# Altium PCB AVP32F069_EVM_Rev1.1_220623.PcbDoc (part 1 of 2)
Units mm, origin at the board's own origin, x right, y up, seen from the top; angles counter-clockwise.
Board outline 130.01 x 88 mm, 4 copper layers (Top Layer, GND, S1, Bottom Layer), stack 2.642 mm thick; 134 components, 131 nets, 561 pads, 238 vias.
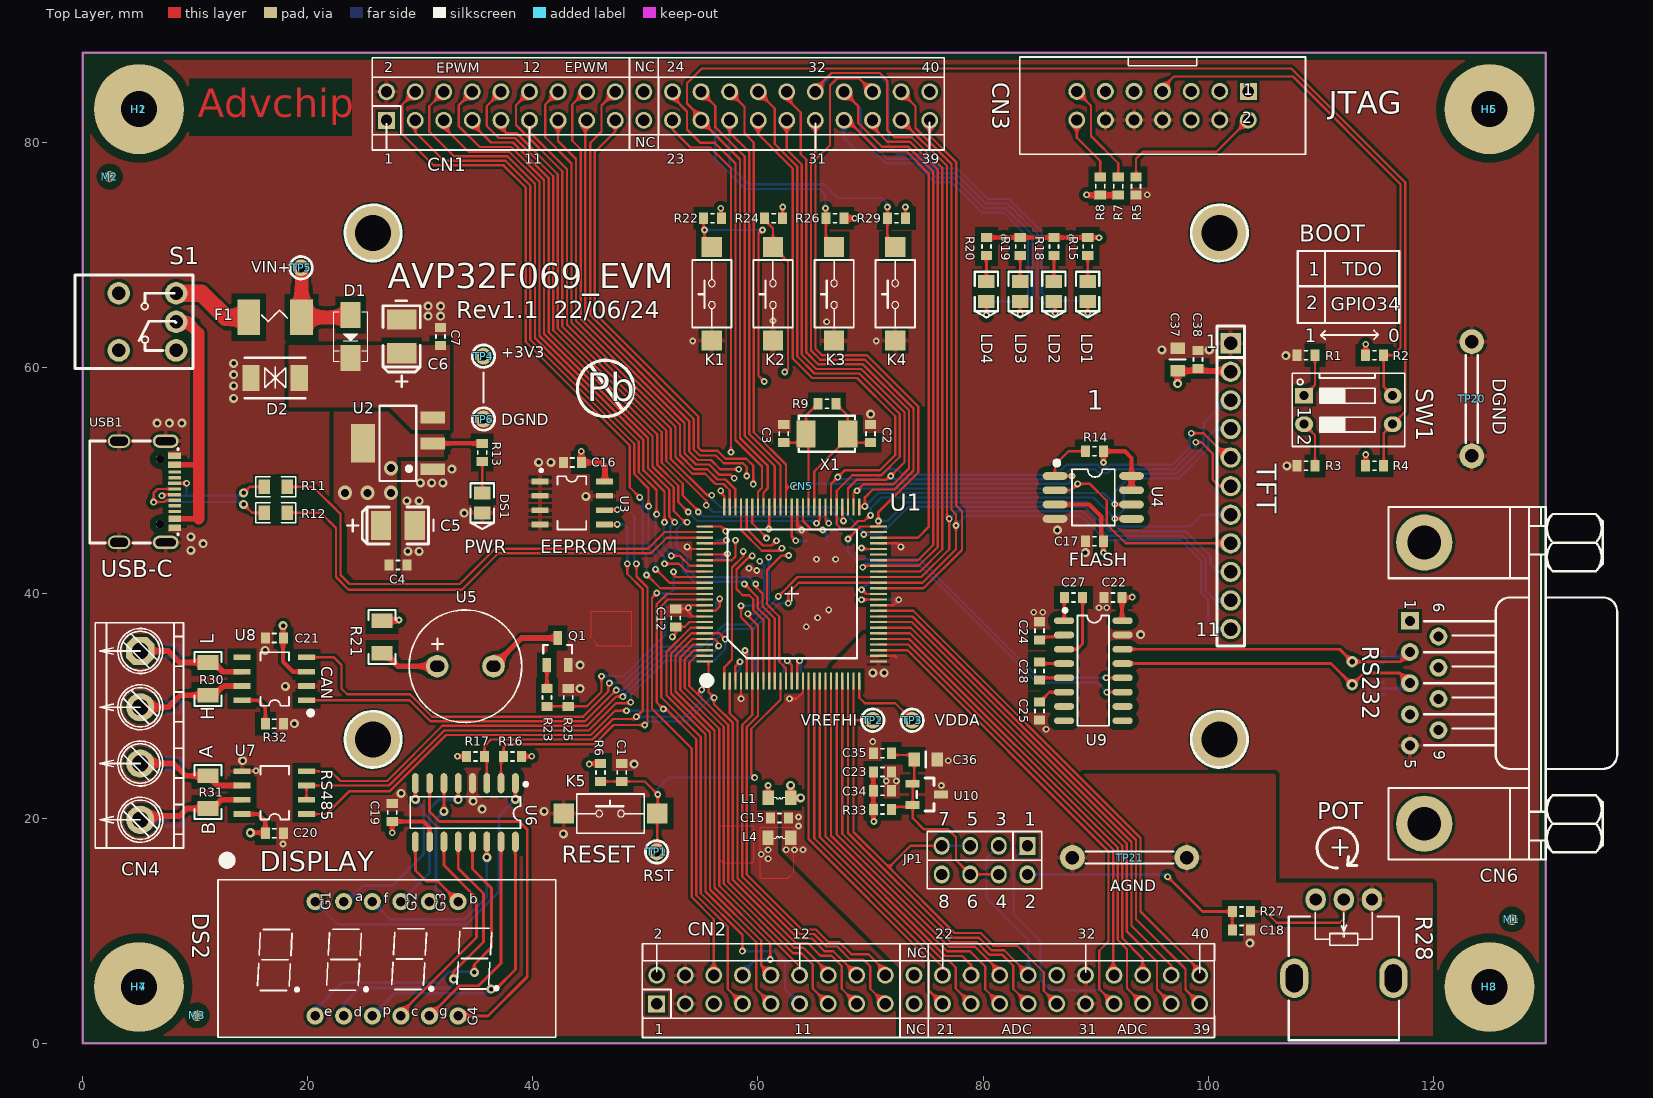
[diagram p0: Top Layer view]
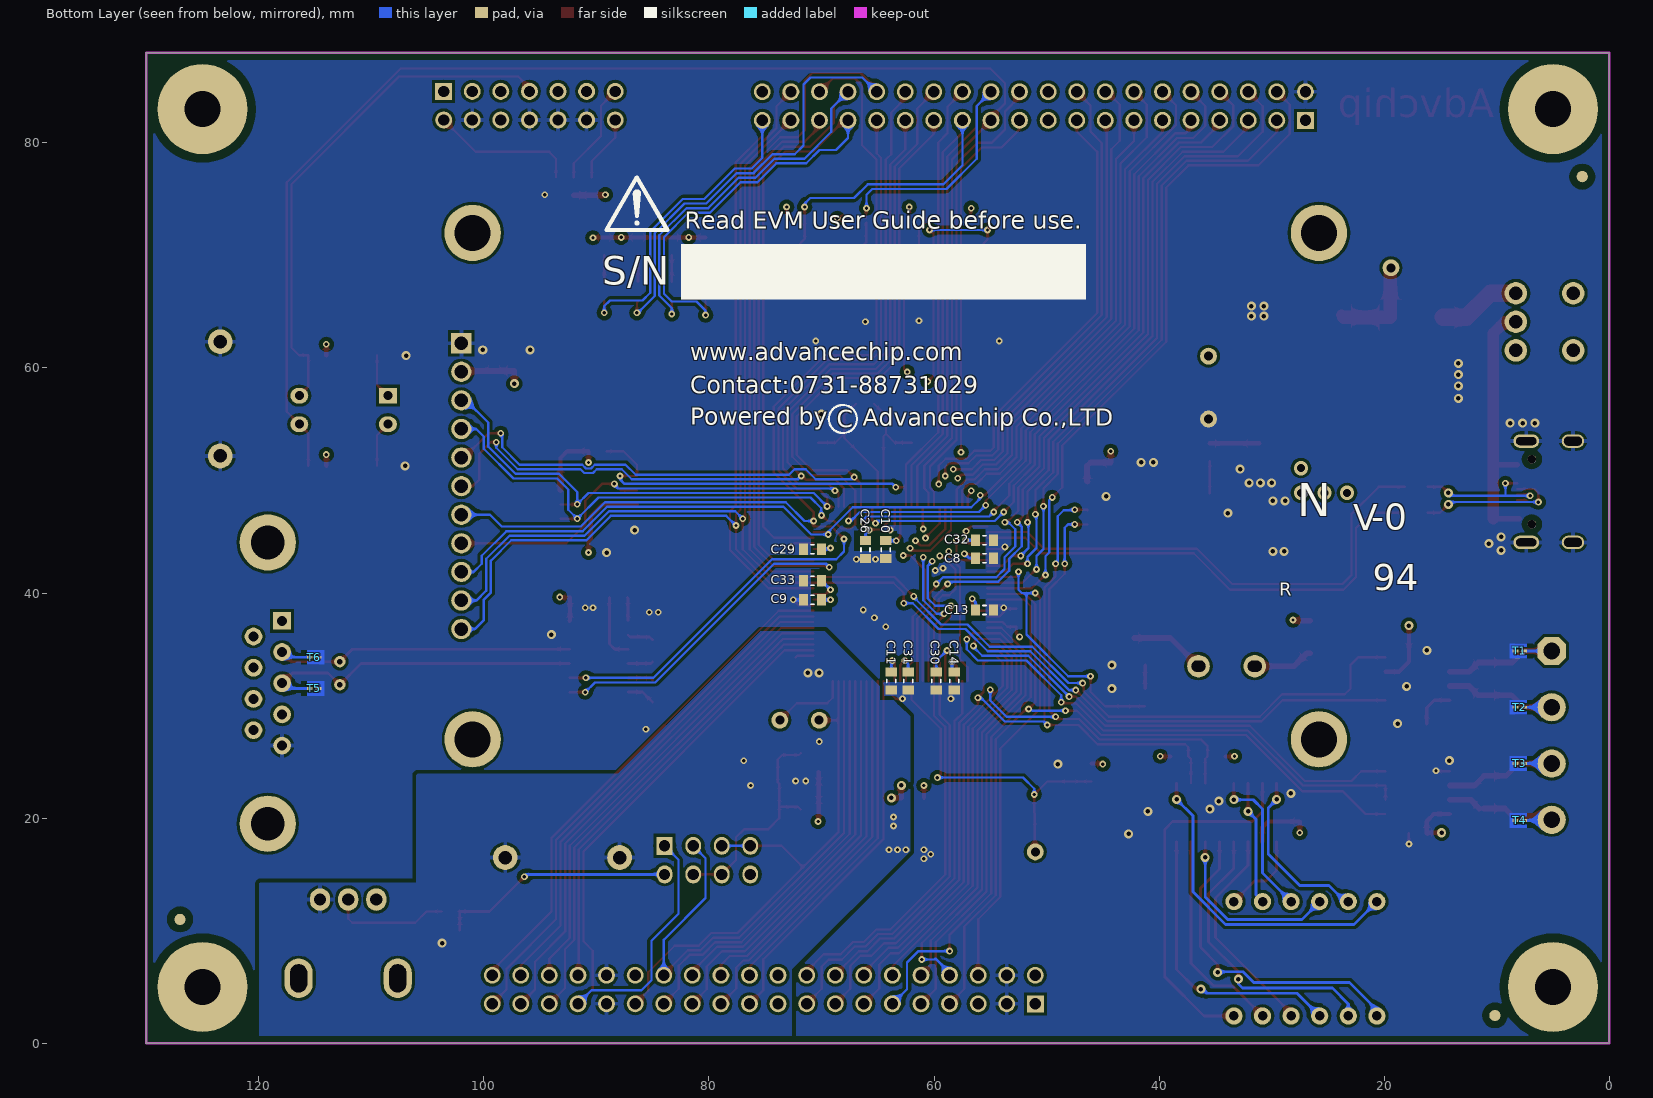
[diagram p1: Bottom Layer view, seen from below]
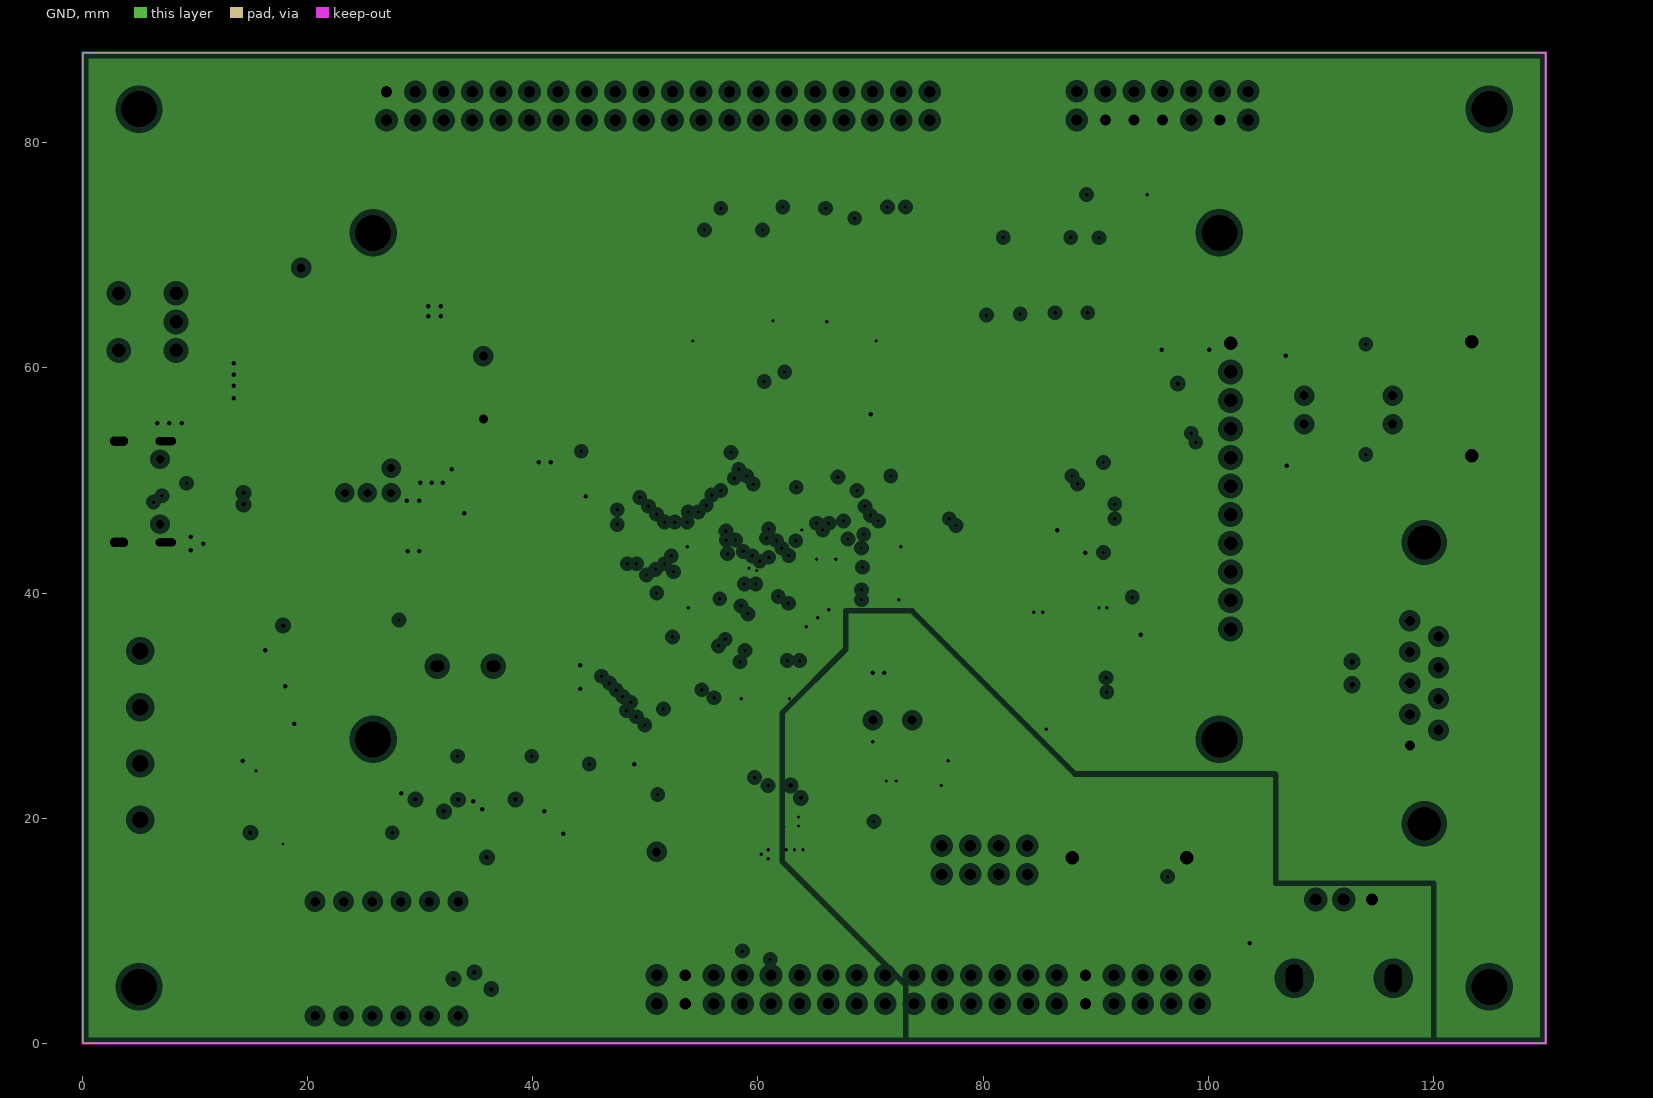
[diagram p2: GND, clearances drawn from the general rule]
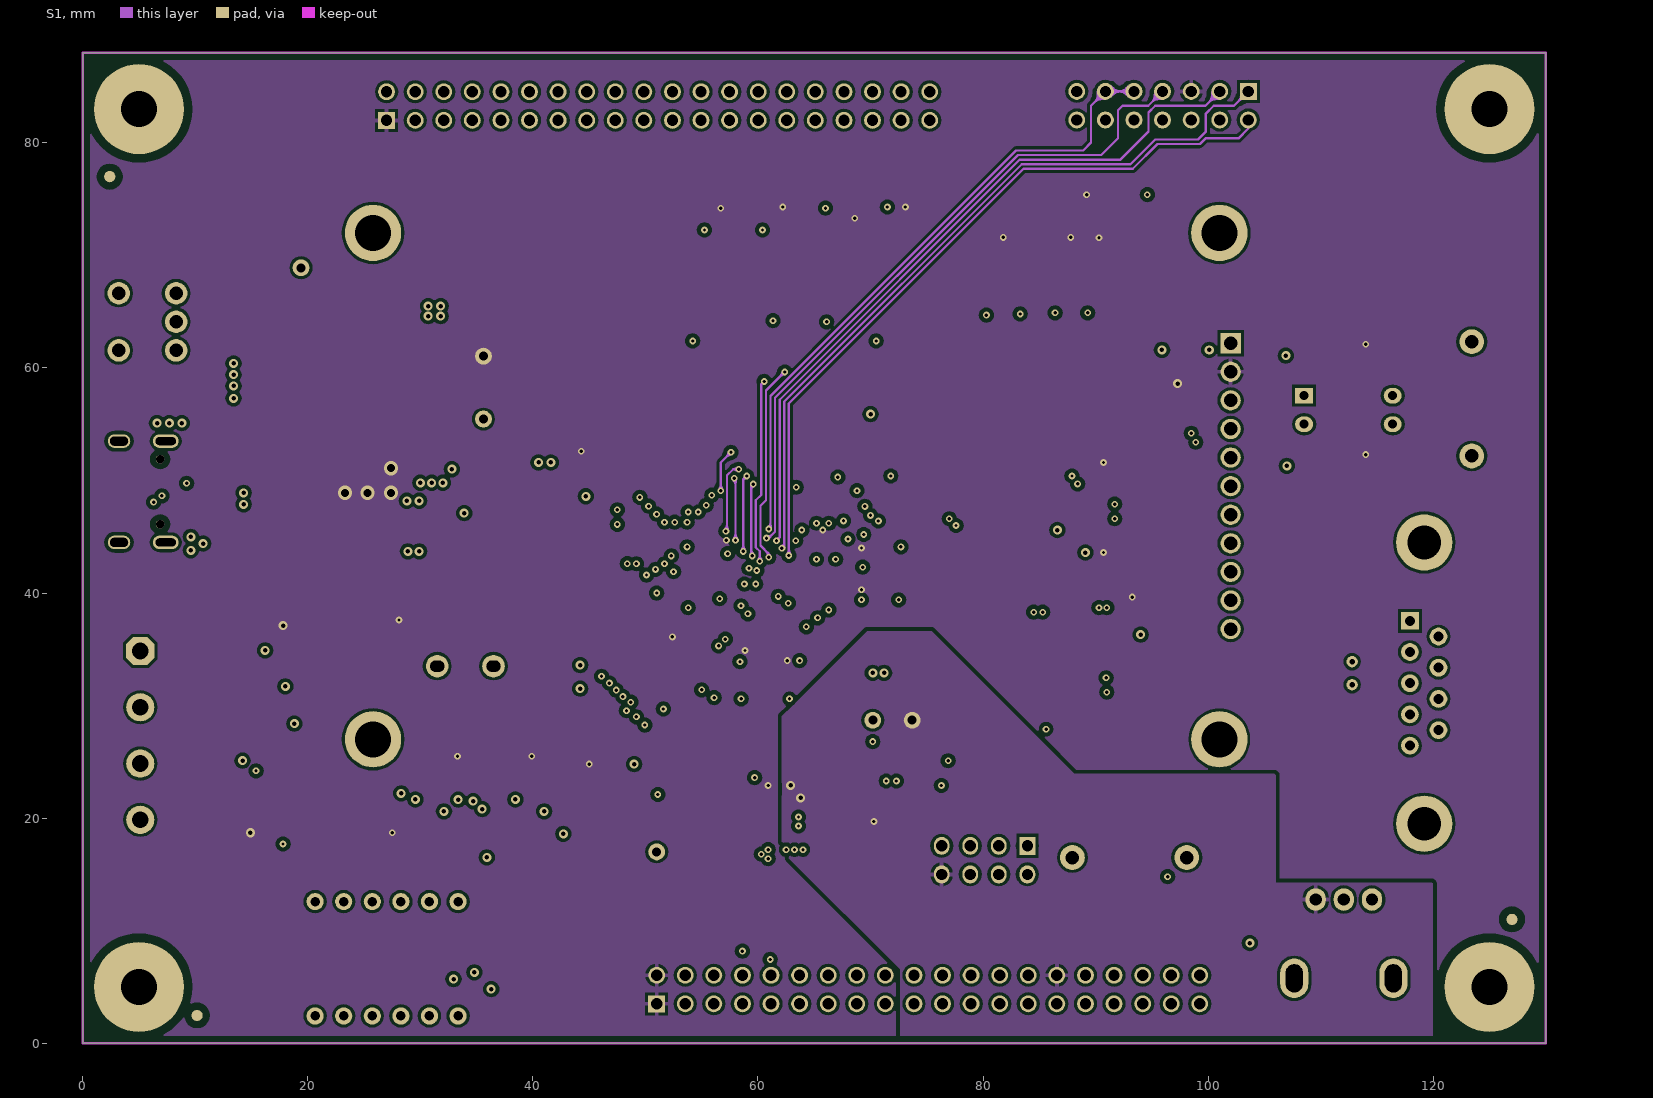
[diagram p3: S1]

## Layer stack, top to bottom
Top Solder: solder mask 0.0102, Solder Resist, Dk 3.5
Top Layer: signal copper 0.0711
Dielectric 3: dielectric 0.254, Dk 4.2
GND: plane copper 0.036, net (Multiple Nets)
Dielectric4: dielectric 0.32, FR-4, Dk 4.8
S1: signal copper 0.036
Dielectric 4: dielectric 0.254, Dk 4.2
Dielectric 2: core 1.6, FR-4, Dk 4.2
Bottom Layer: signal copper 0.0711
Bottom Solder: solder mask 0.0102, Solder Resist, Dk 3.5

## Board outline
0,0 0,88 130.013,88 130.013,0

## Design rules (kind name [scope] priority, off if disabled: settings)
AcuteAngle [All] p1 off: minimum=4.50000000000000E+0001 checktracksonly=FALSE
AssemblyTestPointUsage [All] p1: valid=2
BoardOutlineClearance BoardOutlineClearance_MountingHoles [OnCopper and InComponentClass('Mounting Holes')] p1: gap=1.016 ignorepadtopadclearanceinfootprint=FALSE
BoardOutlineClearance BoardOutlineClearance_Poly [OnCopper and IsPoly] p2: gap=0.635 ignorepadtopadclearanceinfootprint=FALSE
Clearance Clearance_PAD_NC [InNet('PAD_NC')] p1: gap=0.381 ignorepadtopadclearanceinfootprint=TRUE
Clearance Clearance_dingwei [HasFootprint('NY PMS 440 0025 PH')] p2: gap=0.762 ignorepadtopadclearanceinfootprint=TRUE
Clearance Clearance_MCU [All vs InComponent('U1')] p3: gap=0.152 ignorepadtopadclearanceinfootprint=TRUE except(0.381: SMDPad-Fill SMDPad-Poly SMDPad-Region) // MCU安全间距
Clearance Clearance_Keepouts [((IsTrack Or IsArc) And Not InPoly) And IsFree and IsKeepOut vs ((IsTrack Or IsArc) And Not InPoly) And IsFree and IsKeepOut] p4: gap=0 ignorepadtopadclearanceinfootprint=FALSE
Clearance Clearance_Poly [InPolygon] p5: gap=0.254 ignorepadtopadclearanceinfootprint=TRUE except(0.381: Fill-Fill Fill-Poly Fill-Region Poly-Poly Poly-Region Region-Region; 0.508: SMDPad-SMDPad SMDPad-THPad SMDPad-Fill SMDPad-Poly SMDPad-Region SMDPad-Text SMDPad-Hole THPad-THPad THPad-Via THPad-Text THPad-Hole Via-Text Via-Hole Fill-Text Fill-Hole Poly-Text Poly-Hole Region-Text Region-Hole Text-Text Text-Hole)
Clearance [All] p6: gap=0.203 ignorepadtopadclearanceinfootprint=TRUE except(0.127: Arc-Via Track-Via)
ComponentClearance [All] p1 off: gap=0.762 collisioncheckmode=3 verticalgap=0.254 showdistances=FALSE
DiffPairsRouting [All] p1: maxlimit=2.54 minlimit=0.254 mostfreqgap=0.254 toplayer_minwidth=0.381 toplayer_maxwidth=0.381 toplayer_prefwidth=0.381 midlayer1_minwidth=0.381 midlayer1_maxwidth=0.381 midlayer1_prefwidth=0.381 bottomlayer_minwidth=0.381 bottomlayer_maxwidth=0.381 bottomlayer_prefwidth=0.381 maxuncoupledlength=25.4
FabricationTestPointUsage TestPointUsage [All] p1: valid=2 allowmultiple=FALSE
FabricationTestpoint Testpoint [All] p1: side=3 testpointundercomponent=TRUE minsize=1.016 maxsize=2.54 preferedsize=1.524 minholesize=0 maxholesize=1.016 preferedholesize=0.813 testpointgrid=0.025 allowsidetop=TRUE allowsidebottom=TRUE usegrid=TRUE gridtolerance=0
FanoutControl Fanout_LCC [IsLCC] p1: bgadir=Out bgaviamode=Centered fanoutstyle=Auto fanoutdirection=Alternating viagrid=0.025 // Fanout_LCC (Default Rule)
FanoutControl Fanout_SOIC [IsSOIC] p2: bgadir=Out bgaviamode=Centered fanoutstyle=Auto fanoutdirection=Alternating viagrid=0.025 // Fanout_SOIC (Default Rule)
FanoutControl Fanout_Default [All] p3: bgadir=Out bgaviamode=Centered fanoutstyle=Auto fanoutdirection=Alternating viagrid=0.025 // Fanout_Default (Default Rule)
HoleSize [All] p1: absolutevalues=TRUE maxlimit=6.375 minlimit=0.203 maxpercent=80.000 minpercent=20.000
Length SRAM_DATA [InNetClass('SRAM_DATA')] p1 off: maxlimit=43.688 minlimit=41.148
Length SRAM_ADDR [InNetClass('SRAM_ADDR')] p2 off: maxlimit=46.177 minlimit=43.637 // 高速线长度
MinimumAnnularRing MinimumAnnularRing_ThermalPadVias [IsVia and InAnyComponent] p1: minimumring=0.15
MinimumAnnularRing [All] p2: minimumring=0.127
MinimumSolderMaskSliver [All] p1: minsoldermaskwidth=0
PlaneClearance [All] p1: clearance=0.508
PlaneConnect [All] p1: planeconnectstyle=Direct reliefexpansion=0.254 reliefentries=4 reliefconductorwidth=0.254 reliefairgap=0.254
PolygonConnect PolygonConnect_Connectors [All vs (HasFootprint('IDC2X10') OR HasFootprint('IDC2X16') OR HasFootprint('IDC2X22') OR HasFootprint('IDC14-L') OR HasFootprint('DC-005') OR HasFootprint('J-DG128-2') OR HasFootprint('PJ325')OR HasFootprint('RK09K1130') OR HasFootprint('SIP11_TFT') OR HasFootprint('USB-C-SMD-16P') OR HasFootprint('SIP4X2A'))] p1: thpad.connectstyle=Relief thpad.reliefconductorwidth=0.381 thpad.reliefentries=4 thpad.polygonreliefangle="90 Angle" thpad.airgapwidth=0.254 smdpad.connectstyle=Direct smdpad.reliefconductorwidth=0.254 smdpad.reliefentries=4 smdpad.polygonreliefangle="90 Angle" smdpad.airgapwidth=0.254 via.connectstyle=Direct via.reliefconductorwidth=0.254 via.reliefentries=4 via.polygonreliefangle="90 Angle" via.airgapwidth=0.254
PolygonConnect PolygonConnect_SMD2 [All vs (HasFootprint('C0603') OR HasFootprint('R0603') OR HasFootprint('SOT-23-6') OR HasFootprint('C1206') OR HasFootprint('C0805') OR HasFootprint('R0805') OR HasFootprint('SH1.0-8P') OR HasFootprint('SOT-23') OR HasFootprint('SIP3') OR HasFootprint('0603_LED_RED_NP'))] p2: thpad.connectstyle=Relief thpad.reliefconductorwidth=0.381 thpad.reliefentries=4 thpad.polygonreliefangle="90 Angle" thpad.airgapwidth=0.254 smdpad.connectstyle=Direct smdpad.reliefconductorwidth=0.381 smdpad.reliefentries=4 smdpad.polygonreliefangle="90 Angle" smdpad.airgapwidth=0.254 via.connectstyle=Direct via.reliefconductorwidth=0.254 via.reliefentries=4 via.polygonreliefangle="90 Angle" via.airgapwidth=0.254
PolygonConnect PolygonConnect_SMD1 [All vs ( HasFootprint('DB9') OR HasFootprint('SO-8') OR HasFootprint('SW-3X6') OR HasFootprint('LQFP-100') OR HasFootprint('SMD_LED0805_LED') OR HasFootprint('CASE-A-3216') OR HasFootprint('IDC2X20') OR HasFootprint('J-DG128-5') OR HasFootprint('Harwin_D3082-05'))] p3: thpad.connectstyle=Relief thpad.reliefconductorwidth=0.381 thpad.reliefentries=4 thpad.polygonreliefangle="90 Angle" thpad.airgapwidth=0.254 smdpad.connectstyle=Relief smdpad.reliefconductorwidth=0.381 smdpad.reliefentries=4 smdpad.polygonreliefangle="90 Angle" smdpad.airgapwidth=0.254 via.connectstyle=Direct via.reliefconductorwidth=0.254 via.reliefentries=4 via.polygonreliefangle="90 Angle" via.airgapwidth=0.254
PolygonConnect [All] p4: connectstyle=Direct reliefconductorwidth=0.254 reliefentries=4 polygonreliefangle="90 Angle" airgapwidth=0.254
RoutingVias ThermalPadVias [IsVia and InAnyComponent] p1: holewidth=0.305 width=0.635 viastyle="Through Hole" minholewidth=0.254 minwidth=0.508 maxholewidth=0.762 maxwidth=1.27
RoutingVias [All] p2: holewidth=0.305 width=0.635 viastyle="Through Hole" minholewidth=0.254 minwidth=0.508 maxholewidth=0.762 maxwidth=1.27
SilkToBoardRegionClearance [Not ((IsComment or IsDesignator) And (Hide <> 'False')) and not InRegion(1000,500,4000,800)] p1:
SilkToSilkClearance SilkToSilkClearance_Pb-FreeLogo [(HasFootprint('Pb-Free_Overlay_Medium') OR HasFootprint('Pb-Free_Overlay_Small')) vs (HasFootprint('Pb-Free_Overlay_Medium') OR HasFootprint('Pb-Free_Overlay_Small'))] p1 off: silktosilkclearance=0
SilkToSilkClearance [All] p2 off: silktosilkclearance=0.102
SilkToSolderMaskClearance SilkToComponentPadClearance [(IsPad or IsFill or IsRegion) and InAnycomponent] p1 off: minsilkscreentomaskgap=0.099 clearancetoexposedcopper=TRUE
SilkToSolderMaskClearance "Silk to Solder Mask Opening" [All] p2 off: minsilkscreentomaskgap=0.102 clearancetoexposedcopper=FALSE
SolderMaskExpansion [All] p1: expansion=0.05
Width [All] p1: maxlimit=2.54 minlimit=0.152 preferedwidth=0.254 checkconnectedcopper=TRUE
14 further rules are at their usual default settings.

## Classes and differential pairs
component class 2.Power: C4 C5 C6 C7 C8 C9 C10 C11 C12 C13 C14 C15 C23 C26 C29 C30 C31 C32 C33 D1 D2 DS1 F1 H1 H2 H3 H4 H5 H6 H7 H8 L1 L4 Logo1 M1 M2 M3 R11 R12 R13 S1 TP2 TP3 TP4 TP5 TP6 TP20 TP21 TP30 U2 USB1
component class "3.uC Peripheral": C16 C17 C18 C19 C34 C35 C36 C511 C514 C515 DS2 JP1 K1 K2 K3 K4 LD1 LD2 LD3 LD4 Q1 R14 R15 R16 R17 R18 R19 R20 R21 R22 R23 R24 R25 R26 R27 R28 R29 R33 U3 U4 U5 U6 U10
component class "4.Communication Interface": C20 C21 C22 C24 C25 C27 C28 C58 CN4 CN6 CN7 R30 R31 R32 T1 T2 T3 T4 T5 T6 U7 U8 U9

## Components (designator, comment, footprint, x,y, rotation, side; value= is the part's Value field where it differs from the comment)
C1 "0.1uF/50V" C0603 47.9,24.05 r90 top value=0.1uF
C2 "22pF/50V" C0603 70,54.155 r90 top value=100pF
C3 "22pF/50V" C0603 62.3,54.155 r270 top value=100pF
C4 "0.1uF/50V" C0603 28,42.5 r0 top value=0.1uF
C5 "100uF/10V" CASE-B_3528 28,46 r180 top
C6 "100uF/10V" CASE-B_3528 28.342,62.8 r270 top
C7 "0.1uF/50V" C0603 31.8,62.8 r90 top value=0.1uF
C8 "2.2uF/25V" C0603 55.5,43.1 r0 bottom value=2.2uF
C9 "2.2uF/25V" C0603 70.8,39.4 r180 bottom value=2.2uF
C10 "2.2uF/25V" C0603 64.281,43.849 r90 bottom value=2.2uF
C11 "2.2uF/25V" C0603 63.8,32.2 r90 bottom value=2.2uF
C12 "0.1uF/50V" C0603 52.7,37.8 r90 top value=0.1uF
C13 "2.2uF/25V" C0603 55.5,38.5 r0 bottom value=2.2uF
C14 "2.2uF/25V" C0603 58.2,32.2 r90 bottom value=2.2uF
C15 "1uF/25V" C0603 61.91,20.019 r180 top value=1uF
C16 "0.1uF/50V" C0603 43.5,51.6 r180 top value=0.1uF
C17 "0.1uF/50V" C0603 89.9,44.6 r180 top value=0.1uF
C18 "0.1uF/50V" C0603 102.95,10.049 r0 top value=0.1uF
C19 "0.1uF/50V" C0603 27.5,20.5 r90 top value=0.1uF
C20 "0.1uF/50V" C0603 17.022,18.662 r0 top value=0.1uF
C21 "0.1uF/50V" C0603 17.022,36 r180 top value=0.1uF
C22 "0.1uF/50V" C0603 91.551,39.6 r180 top value=0.1uF
C23 "2.2uF" C0603 71.051,24.1 r180 top
C24 "0.1uF/50V" C0603 85.019,36.649 r90 top value=0.1uF
C25 "0.1uF/50V" C0603 85.019,29.505 r270 top value=0.1uF
C26 "2.2uF" C0603 66.081,43.849 r90 bottom
C27 "0.1uF/50V" C0603 88.051,39.6 r0 top value=0.1uF
C28 "0.1uF/50V" C0603 85.019,33.077 r270 top value=0.1uF
C29 "2.2uF" C0603 70.8,43.9 r180 bottom
C30 "2.2uF" C0603 59.8,32.2 r90 bottom
C31 "2.2uF" C0603 62.3,32.2 r90 bottom
C32 "2.2uF" C0603 55.5,44.7 r0 bottom
C33 "2.2uF" C0603 70.8,41.1 r180 bottom
C34 "1uF/25V" C0603 71.051,22.433 r0 top value=1uF
C35 "0.1uF/50V" C0603 71.051,25.767 r180 top value=0.1uF
C36 "10uF/10V" C0805 74.9,25.2 r0 top value=10uF
C37 "10uF/10V" C0805 97.3,60.749 r90 top
C38 "0.1uF/50V" C0603 99.1,60.749 r90 top value=0.1uF
CN1 "2.54-2X20P 排针" IDC2X20 27,82 r0 top locked
CN2 "2.54-2X20P 排针" IDC2X20 51,3.5 r0 top locked
CN3 "2.54-2X7P 简易牛角母座" IDC14-L 98.488,83.286 r180 top value=2.54-2X7P
CN4 "KF301-4P-5.08" J-DG128-4 5.113,27.35 r270 top
CN5 "2.54MM*11P 单排排母" SIP11_TFT 102,49.5 r0 top locked
CN6 "DB9" db9 119.2,32 r0 top locked
D1 "SS14" SMA 23.8,62.8 r90 top
D2 "SMBJ6.8CA" SMB2 17.1,59.1 r0 top
DS1 "黄色LED" SMD_LED0805_LED 35.5,48 r90 top
DS2 "FJ3461AH" 0.36X4 27,7.5 r0 top value=0.36×4
F1 "1.5A/24V" 1812_PTC_NP 17.1,64.5 r0 top
H1 "M3*12+6" "NY PMS 440 0025 PH" 5,83 r90 top locked
H2 "PN-3" Keystone_1902C 5,83 r0 top locked
H3 "M3*12+6" "NY PMS 440 0025 PH" 125,5 r90 top locked
H4 "PN-3" Keystone_1902C 5,5 r0 top locked
H5 "M3*12+6" "NY PMS 440 0025 PH" 125,83 r90 top locked
H6 "PN-3" Keystone_1902C 125,83 r0 top locked
H7 "M3*12+6" "NY PMS 440 0025 PH" 5,5 r90 top locked
H8 "PN-3" Keystone_1902C 125,5 r0 top locked
JP1 "XH2.54-2X4P" SIP4X2A 80.13,16.27 r270 top
K1 "1TS002B-2400-5001-CT" SW-3X6 55.9,66.6 r90 top value=1TS002B
K2 "1TS002B-2400-5001-CT" SW-3X6 61.333,66.6 r90 top value=1TS002B
K3 "1TS002B-2400-5001-CT" SW-3X6 66.767,66.6 r90 top value=1TS002B
K4 "1TS002B-2400-5001-CT" SW-3X6 72.2,66.6 r90 top value=1TS002B
K5 "1TS002B-2400-5001-CT" SW-3X6 46.9,20.4 r0 top value=1TS002B
L1 "BLM21PG221SN" L-0805 61.916,21.8 r180 top value=220Ω@100MHZ
L4 "BLM21PG221SN" L-0805 61.91,18.266 r0 top value=220Ω@100MHZ
LD1 "Red" SMD_LED0805_LED 89.3,66.8 r90 top
LD2 "Red" SMD_LED0805_LED 86.3,66.8 r90 top
LD3 "Red" SMD_LED0805_LED 83.3,66.8 r90 top
LD4 "Red" SMD_LED0805_LED 80.3,66.8 r90 top
Logo1 "CAUTION.  READ USER GUIDE BEFORE USE" IEC_Caution_Small 407.4,418.8 r180 bottom
M1 "" Mark1 127,11 r0 top
M2 "" Mark1 2.4,77 r0 top
M3 "" Mark1 10.16,2.464 r0 top
Q1 "2N7002K" MOS-SOT23 42.2,34.8 r0 top
R1 "1KΩ" R0603 108.7,61.137 r0 top value=1K
R2 "10KΩ" R0603 114.797,61.137 r180 top value=1K
R3 "1KΩ" R0603 108.7,51.3 r0 top value=1K
R4 "10KΩ" R0603 114.8,51.3 r180 top value=1K
R5 "2.2KΩ" R0603 93.6,76.15 r90 top value=1K
R6 "10KΩ" R0603 46,24.05 r270 top value=1K
R7 "10KΩ" R0603 92.007,76.15 r90 top value=1K
R8 "10KΩ" R0603 90.413,76.15 r90 top value=1K
R9 "1MΩ" R0603 66.125,56.822 r180 top value=1K
R11 "22Ω" 0805RX 17.141,49.433 r0 top value=1K
R12 "22Ω" 0805RX 17.141,47.133 r0 top value=1K
R13 "1KΩ" R0603 35.5,52.5 r270 top value=1K
R14 "10KΩ" R0603 89.9,52.6 r180 top value=1K
R15 "1KΩ" R0603 89.3,70.8 r90 top value=1K
R16 "2.2KΩ" R0603 38.2,25.476 r0 top value=1K
R17 "2.2KΩ" R0603 34.9,25.476 r180 top value=1K
R18 "1KΩ" R0603 86.3,70.8 r90 top value=1K
R19 "1KΩ" R0603 83.3,70.8 r90 top value=1K
R20 "1KΩ" R0603 80.3,70.8 r90 top value=1K
R21 "22R" 1206RX 26.6,36.1 r270 top value=1K
R22 "10KΩ" R0603 55.95,73.3 r180 top value=1K
R23 "1KΩ" R0603 41.25,30.734 r270 top value=1K
R24 "10KΩ" R0603 61.4,73.3 r180 top value=1K
R25 "4.7KΩ" R0603 43.15,30.734 r90 top value=1K
R26 "10KΩ" R0603 66.85,73.3 r180 top value=1K
R27 "1KΩ" R0603 102.95,11.7 r180 top value=1K
R28 "RK09K1130A6S  10KΩ" RK09K1130 112.057,5.766 r180 top locked
R29 "10KΩ" R0603 72.3,73.3 r180 top value=1K
R30 "120R" 1206RX 11.122,32.379 r270 top
R31 "120R" 1206RX 11.122,22.304 r270 top value=1K
R32 "10KΩ" R0603 17.022,28.379 r180 top value=1K
R33 "470R" R0603 71.051,20.767 r0 top
S1 "SMTS-102C3" SW2 8.3,64.1 r0 top
SW1 "DS-02RP" DIP-KEY-2 107.465,59.52 r270 top
T1 "SPARK_GAP" SPARK_GAP 8.085,34.85 r270 bottom
T2 "SPARK_GAP" SPARK_GAP 8.085,29.85 r270 bottom
T3 "SPARK_GAP" SPARK_GAP 8.085,24.862 r270 bottom
T4 "SPARK_GAP" SPARK_GAP 8.085,19.8 r270 bottom
T5 "SPARK_GAP" SPARK_GAP 114.954,31.527 r90 bottom
T6 "SPARK_GAP" SPARK_GAP 114.954,34.3 r90 bottom
TP1 "RST" TEST-0.8/1.5MM 51,17 r0 top
TP2 "VREFHI" TEST-0.8/1.5MM 70.2,28.7 r0 top
TP3 "VDDA" TEST-0.8/1.5MM 73.7,28.7 r0 top
TP4 "+3V3" TEST-0.8/1.5MM 35.608,61.052 r0 top
TP5 "VIN+" TEST-0.8/1.5MM 19.4,68.9 r0 top
TP6 "DGND" TEST-0.8/1.5MM 35.608,55.464 r0 top
TP20 "D3082-05" Harwin_D3082-05 123.425,57.258 r90 top
TP21 "D3082-05" Harwin_D3082-05 93.02,16.5 r180 top
U1 "AVP32F069QP100S" LQFP-100 63,40 r90 top locked
U2 "AMS1117-3.3V" SOT-223 28,53.3 r90 top
U3 "AT24C02D-SSHM-T" SO-8 43.5,48 r270 top
U4 "W25Q32JVSSIQ" SOIC-8_208mil 89.8,48.5 r270 top
U5 "Cy-9650-3029" SUN-0905-3V 34,33.5 r0 top locked
U6 "AIP650" SOIC-16_150mil 34,20.5 r180 top locked
U7 "SP3485EN-L/TR" SO-8 17.022,22.262 r90 top
U8 "SN65HVD230D" SO-8 17.022,32.379 r90 top
U9 "SP3232EEN" SOIC-16_150mil 89.8,33.1 r270 top
U10 "TL431" SOT-23 75,22.1 r180 top
USB1 "TYPE-C-31-M-31" USB-C-SMD-16P 5.7,49 r90 top
X1 "YSX530GA 10MHZ 20pF 10ppm" XTAL_5032 66.125,54.149 r0 top value=10MHZ

## Footprints (in the part's own frame and the unit in brackets; to place one, negate y for a bottom-side part, rotate by r counter-clockwise, add the part's x,y. Pads: shape width x height; smd on the part's side, far side on the other; paste and mask are expansions set on the pad)
0.36X4 [mil] "4位0.36寸数码管"
  round 60 hole 33.46: a(-150,200) b(250,200) c(50,-200) com1(-250,200) com2(50,200) com3(150,200) com4(250,-200) d(-150,-200) dp(-50,-200) e(-250,-200) f(-50,200) g(150,-200)
  silkscreen extent -590,-275 592,276, body extent -591,-276 591,276, height 283
0805RX [mil] "标准型  间距40mil"
  rect 40x50 smd: 1(-40,0) 2(40,0)
  silkscreen extent -70,-35 70,35, body extent -38,-25 41,25, height 22
1206RX [mm]
  rect 1.3x1.85 smd: 1(-1.45,0) 2(1.45,0)
  silkscreen extent -2.4,-1.21 2.4,1.21, body extent -1.57,-0.8 1.63,0.8, height 0.6
1812_PTC_NP [mil]
  rect 80x125 smd: 1(-92.5,0) 2(92.5,0)
  silkscreen extent -47,-15 42,25, body extent -84,-63 94,63, height 20
C0603 [mm] "无丝印       D=1.6"
  rect 0.8x1 smd mask+0.051: 1(-0.8,0) 2(0.8,0)
  silkscreen extent -0.15,-0.4 0.15,0.4, body extent -0.71,-0.38 0.81,0.38, height 0.68
C0805 [mil]
  rect 40x50 smd: 1(-40,0) 2(40,0)
  silkscreen extent 0,-28 0,28, body extent -59,-28 59,27, height 37
CASE-B_3528 [mm]
  rect 1.8x2.6 smd: 1(1.5,0) 2(-1.5,0)
  silkscreen extent -3.17,-1.65 4.5,1.65, body extent -1.85,-1.47 1.85,1.46, height 2.03
db9 [mil]
  round 196.67 hole 118.33: 0(0,-492.08) 0(0,492.08)
  rect 62x62 hole 35: 1(-50,217.92)
  round 62 hole 35: 2(-50,108.75) 3(-50,-0.42) 4(-50,-109.58) 5(-50,-218.75) 6(50,162.92) 7(50,53.75) 8(50,-55.42) 9(50,-164.58)
  silkscreen extent -125,-617 675,616, body extent -108,-601 550,600, height 124
DIP-KEY-2 [mm]
  rect 1.4x1.6 hole 0.8: 1(1.98,1.065)
  oval 1.4x1.6 hole 0.8: 2(4.52,1.065) 3(4.52,8.935) 4(1.98,8.935)
  silkscreen extent 0,0 6.5,10, body extent -0.05,-0.08 6.55,10.08, height 6.9
Harwin_D3082-05 [mm] "Shorting Plug, 10.16mm spacing, TH     D=1.0"
  round 2.2 hole 1.2: 1(-5.08,0) 2(5.08,0)
  silkscreen extent -3.9,-0.53 3.9,0.53, body extent -5.6,-0.52 5.61,0.52, height 6.63
IDC2X20 [mm] "2.54X40P双排插针"
  rect 1.5x1.5 hole 1: 1(0,0)
  round 1.5 hole 1: 2(0,2.54) 3(2.54,0) 4(2.54,2.54) 5(5.08,0) 6(5.08,2.54) 7(7.62,0) 8(7.62,2.54) 9(10.16,0) 10(10.16,2.54) 11(12.7,0) 12(12.7,2.54) 13(15.24,0) 14(15.24,2.54) 15(17.78,0) 16(17.78,2.54) 17(20.32,0) 18(20.32,2.54) 19(22.86,0) 20(22.86,2.54) 21(25.4,0) 22(25.4,2.54) 23(27.94,0) 24(27.94,2.54) 25(30.48,0) 26(30.48,2.54) 27(33.02,0) 28(33.02,2.54) 29(35.56,0) 30(35.56,2.54) 31(38.1,0) 32(38.1,2.54) 33(40.64,0) 34(40.64,2.54) 35(43.18,0) 36(43.18,2.54) 37(45.72,0) 38(45.72,2.54) 39(48.26,0) 40(48.26,2.54)
  silkscreen extent -1.27,-1.27 49.56,3.84, body extent -1.23,-1.23 49.61,3.85, height 8.4
IDC14-L [mm]
  rect 1.5x1.5 hole 1: 1(-5.084,-1.29)
  round 1.5 hole 1: 2(-5.084,1.25) 3(-2.544,-1.29) 4(-2.544,1.25) 5(-0.004,-1.29) 6(-0.004,1.25) 7(2.536,-1.29) 8(2.536,1.25) 9(5.076,-1.29) 10(5.076,1.25) 11(7.616,-1.29) 12(7.616,1.25) 13(10.156,-1.29) 14(10.156,1.25)
  silkscreen extent -10.16,-4.34 15.24,4.3, body extent -10.18,-4.47 15.26,4.65, height 9.1
IEC_Caution_Small [mm]
  silkscreen extent 318.28,-346.56 323.72,-341.85
J-DG128-4 [mm]
  oct 2.5x2.5 hole 1.5: 1(-7.5,0)
  round 2.5 hole 1.5: 2(-2.5,0) 3(2.5,0) 4(7.5,0)
  silkscreen extent -10,-4 10,3.84, body extent -10,-3.59 10,3.91, height 10
Keystone_1902C [mil] "Hex Standoff, 4-40 threaded, nylon"
  round 1 on Mech4: 0(0,0)
  body extent -145,-126 146,126, height 501
L-0805 [mil] "标准型  间距40mil 电感"
  rect 40x50 smd: 1(-40,0) 2(40,0)
  silkscreen extent -20,-3 19,3, body extent -39,-26 39,24, height 36
LQFP-100 [mm]
  rect 1.5x0.2 smd: 1(-7.807,6.006) 2(-7.807,5.506) 3(-7.807,5.006) 4(-7.807,4.506) 5(-7.807,4.006) 6(-7.807,3.506) 7(-7.807,3.006) 8(-7.807,2.506) 9(-7.807,2.006) 10(-7.807,1.506) 11(-7.807,1.006) 12(-7.807,0.506) 13(-7.807,0.006) 14(-7.807,-0.494) 15(-7.807,-0.994) 16(-7.807,-1.494) 17(-7.807,-1.994) 18(-7.807,-2.494) 19(-7.807,-2.994) 20(-7.807,-3.494) 21(-7.807,-3.994) 22(-7.807,-4.494) 23(-7.807,-4.994) 24(-7.807,-5.494) 25(-7.807,-5.994) 51(7.643,-5.994) 52(7.643,-5.494) 53(7.643,-4.994) 54(7.643,-4.494) 55(7.643,-3.994) 56(7.643,-3.494) 57(7.643,-2.994) 58(7.643,-2.494) 59(7.643,-1.994) 60(7.643,-1.494) 61(7.643,-0.994) 62(7.643,-0.494) 63(7.643,0.006) 64(7.643,0.506) 65(7.643,1.006) 66(7.643,1.506) 67(7.643,2.006) 68(7.643,2.506) 69(7.643,3.006) 70(7.643,3.506) 71(7.643,4.006) 72(7.643,4.506) 73(7.643,5.006) 74(7.643,5.506) 75(7.643,6.006)
  rect 0.2x1.5 smd: 26(-6.082,-7.719) 27(-5.582,-7.719) 28(-5.082,-7.719) 29(-4.582,-7.719) 30(-4.082,-7.719) 31(-3.582,-7.719) 32(-3.082,-7.719) 33(-2.582,-7.719) 34(-2.082,-7.719) 35(-1.582,-7.719) 36(-1.082,-7.719) 37(-0.582,-7.719) 38(-0.082,-7.719) 39(0.418,-7.719) 40(0.918,-7.719) 41(1.418,-7.719) 42(1.918,-7.719) 43(2.418,-7.719) 44(2.918,-7.719) 45(3.418,-7.719) 46(3.918,-7.719) 47(4.418,-7.719) 48(4.918,-7.719) 49(5.418,-7.719) 50(5.918,-7.719) 76(5.918,7.731) 77(5.418,7.731) 78(4.918,7.731) 79(4.418,7.731) 80(3.918,7.731) 81(3.418,7.731) 82(2.918,7.731) 83(2.418,7.731) 84(1.918,7.731) 85(1.418,7.731) 86(0.918,7.731) 87(0.418,7.731) 88(-0.082,7.731) 89(-0.582,7.731) 90(-1.082,7.731) 91(-1.582,7.731) 92(-2.082,7.731) 93(-2.582,7.731) 94(-3.082,7.731) 95(-3.582,7.731) 96(-4.082,7.731) 97(-4.582,7.731) 98(-5.082,7.731) 99(-5.582,7.731) 100(-6.082,7.731)
  silkscreen extent -8.09,-5.8 5.65,7.87, body extent -8.18,-8.1 8.02,8.1, height 2
Mark1 [mm] "基准点 无边框"
  round 1 all layers, no hole: 0(0,0)
MOS-SOT23 [mm] "焊盘加长型"
  rect 0.762x1.27 smd: D(0,1.2) G(-0.95,-1.2) S(0.95,-1.2)
  silkscreen extent -1.27,-0.15 1.27,0.58, body extent -1.45,-1.5 1.45,1.3, height 1.2
"NY PMS 440 0025 PH" [mm] "4-40 nylon screw and mounting hole"
  round 8 hole 3.2: 1(0,0)
  body extent -3.3,-3.3 3.3,3.3, height 2.69
R0603 [mm] "无丝印 脚距1.6mm  0.8/1mm 焊盘"
  rect 0.8x1 smd mask+0.051: 1(-0.8,0) 2(0.8,0)
  silkscreen extent -0.15,-0.4 0.15,0.4, body extent -0.79,-0.4 0.81,0.4, height 0.43
RK09K1130 [mm] "立式可调电位器"
  oval 2.5x3.5 hole 1.5 slot 2.5 at 90 deg: 0(-4.4,0) 0(4.4,0)
  oval 1.8x2 hole 1.1: 1(-2.5,-7) 2(0,-7) 3(2.5,-7)
  silkscreen extent -4.9,-5.88 4.9,5.5, body extent -5.7,-7.15 5.7,5.5, height 19.5
SIP4X2A [mm]
  rect 1.6x1.4 hole 1: 1(-1.27,3.81)
  oval 1.6x1.4 hole 1: 2(1.27,3.81) 3(-1.27,1.27) 4(1.27,1.27) 5(-1.27,-1.27) 6(1.27,-1.27) 7(-1.27,-3.81) 8(1.27,-3.81)
  silkscreen extent -2.54,-5.08 2.54,5.08, body extent -2.59,-5.13 2.44,5.03, height 8.89
SIP11_TFT [mm]
  round 5 hole 3.2: 0(-76.2,-22.5) 0(-76.2,22.5) 0(-1,-22.5) 0(-1,22.5)
  rect 1.8x1.8 hole 1.2: 1(0,12.7)
  round 1.8 hole 1.2: 2(0,10.16) 3(0,7.62) 4(0,5.08) 5(0,2.54) 6(0,0) 7(0,-2.54) 8(0,-5.08) 9(0,-7.62) 10(0,-10.16) 11(0,-12.7)
  silkscreen extent -1.22,-14.22 1.22,14.22, body extent -1.27,-14 1.27,13.94, height 8.5
SMA [mm] "DO-214AC"
  rect 2.3x1.75 smd: 1(1.9,0) 2(-1.9,0)
  silkscreen extent -2.2,-1.5 2.2,1.5, body extent -2.3,-1.37 2.3,1.33, height 2.4
SMB2 [mm] "双向TVS"
  rect 1.52x2.3 smd: 1(-2.14,0) 2(2.14,0)
  silkscreen extent -2.7,-1.8 2.7,1.8, body extent -2.7,-1.8 2.7,1.8, height 2.3
SMD_LED0805_LED [mm]
  rect 1.16x1.47 smd: 1(0.875,0) 2(-0.875,0)
  silkscreen extent -2.3,-1.04 1.76,1.03, body extent -1.01,-0.62 1.01,0.62, height 1.1
SO-8 [mil]
  rect 20x60 smd: 1(-75,-112.5) 2(-25,-112.5) 3(25,-112.5) 4(75,-112.5) 5(75,112.5) 6(25,112.5) 7(-25,112.5) 8(-75,112.5)
  silkscreen extent -119,-114 93,49, body extent -96,-111 96,125, height 64
SOIC-8_208mil [mm]
  oval 0.7x2.2 smd: 1(-1.905,-3.4) 2(-0.635,-3.4) 3(0.635,-3.4) 4(1.905,-3.4) 5(1.905,3.4) 6(0.635,3.4) 7(-0.635,3.4) 8(-1.905,3.4)
  silkscreen extent -3.25,-3.45 2.5,1.9, body extent -2.73,-4 2.73,4.1, height 1.75
SOIC-16_150mil [mm]
  oval 0.6x1.8 smd: 1(-4.445,-2.6) 2(-3.175,-2.6) 3(-1.905,-2.6) 4(-0.635,-2.6) 5(0.635,-2.6) 6(1.905,-2.6) 7(3.175,-2.6) 8(4.445,-2.6) 9(4.445,2.6) 10(3.175,2.6) 11(1.905,2.6) 12(0.635,2.6) 13(-0.635,2.6) 14(-1.905,2.6) 15(-3.175,2.6) 16(-4.445,2.6)
  silkscreen extent -5.51,-2.66 4.9,1.4, body extent -5,-2.8 4.98,3.11, height 1.45
SOT-23 [mm]
  rect 1.25x0.7 smd: 1(1.25,-0.95) 2(1.25,0.95) 3(-1.25,0)
  silkscreen extent -0.65,-1.46 0.9,1.46, body extent -1.5,-1.5 1.5,1.5, height 1.3
SOT-223 [mm] "SOT-223/SC-73; 4 Leads; Body 6.7 x 7.3 mm, inc. leads (LxW max)"
  rect 1.05x2.15 smd: 1(-2.3,-3.1) 2(0,-3.1) 3(2.3,-3.1)
  rect 3.4x2.15 smd: 2(0,3.1)
  silkscreen extent -3.35,-1.63 3.35,1.63, body extent -3.3,-3.5 3.4,3.71, height 1.85
SPARK_GAP [mil] "无Paste层"
  rect 10x20 smd paste-39.37: 1(0,20) 2(0,-10)
  Top Layer region: -15,30 -25,30 -25,-30 25,-30 25,30 15,30 15,-20 -15,-20
SUN-0905-3V [mm] "蜂鸣器/9.6*5 有源 3V 电磁蜂鸣器"
  round 2 hole 1 slot 1.25 at 0 deg: 1(-2.5,0) 2(2.5,0)
  silkscreen extent -5,-5 5,5, body extent -4.99,-5 5,5, height 6.05
SW2 [mm] "扭子开关单刀无复位无中点"
  round 2 hole 1.2: 0(-5.1,-2.54) 0(-5.1,2.54) 1(0,-2.54) 2(0,0) 3(0,2.54)
  silkscreen extent -9,-4.15 1.5,4.15, body extent -26.1,-4.11 0.7,4.01, height 5.96
SW-3X6 [mm] "立创商城 轻触开关 3X6 鸿源精密"
  rect 1.8x1.8 smd mask+0.05: 1(4.15,0) 2(-4.15,0)
  silkscreen extent -3,-1.75 3,1.75, body extent -2.95,-1.75 2.95,1.75, height 4
TEST-0.8/1.5MM [mm]
  round 1.5 hole 0.8: 1(0,0)
  silkscreen extent -1,-1 1,1
USB-C-SMD-16P [mm]
  oval 1.2x2.3 hole 0.7 slot 1.8 at 90 deg: 0(-4.5,-1.675) 0(4.5,-1.675)
  oval 1.2x2 hole 0.8 slot 1.6 at 90 deg: 0(-4.5,2.475) 0(4.5,2.475)
  rect 0.3x1.15 smd mask+0.08: A1B12(3.05,-2.473) A1B12(3.35,-2.473) A4B9(2.25,-2.471) A4B9(2.55,-2.471) A5(1.25,-2.475) A6(0.25,-2.475) A7(-0.25,-2.473) A9B4(-2.55,-2.475) A9B4(-2.25,-2.475) A12B1(-3.35,-2.475) A12B1(-3.05,-2.475) B5(-1.75,-2.475) B6(-0.75,-2.475) B7(0.75,-2.473)
  rect 0.3x1.148 smd mask+0.08: A8(1.75,-2.475) B8(-1.25,-2.475)
  round 0.75 hole 0.75 unplated: ""(-2.89,-1.175) ""(2.89,-1.175)
  silkscreen extent -4.56,-2.75 4.5,5.08, body extent -4.45,-2.87 4.49,5.03, height 3.25
XTAL_5032 [mm] "5032晶振"
  rect 1.7x2.4 smd: 1(-1.85,0) 2(1.85,0)
  silkscreen extent -2.5,-1.6 2.5,1.6, body extent -2.53,-1.55 2.47,1.65, height 1.3

## Part data
C1 C4 C7 C8 C9 C10 C11 C12 C13 C14 C15 C16 C17 C18 C19 C20 C21 C22 C23 C24 C25 C26 C27 C28 C29 C30 C31 C32 C33 C34 C35 C36 C37 C38: library part Cap, "贴片电容", LatestRevisionDate=17-Jul-2002, LatestRevisionNote="Re-released for DXP Platform.", Published=8-Jun-2000, Publisher="Altium Limited"
C2 C3: library part Cap, "COG贴片电容", LatestRevisionDate=17-Jul-2002, LatestRevisionNote="Re-released for DXP Platform.", Published=8-Jun-2000, Publisher="Altium Limited"
C5 C6: library part CAP2, "钽电容", Tolerance error=10%, Brand Name=三星, cost=￥0.01
CN1 CN2: library part "CON 20X2A", "连接器"
CN3: library part Receptacle_7X2, "连接器"
CN4: library part CON4, "连接器"
CN5: library part KH-2.54FH-1X11P-H8.5, "连接器", BOM_Manufacturer=kinghelm(金航标), BOM_Manufacturer Part=KH-2.54FH-1X11P-H8.5, BOM_Supplier=LCSC, BOM_Supplier Part=C2932674, Contributor=LCSC, spicePre=U, spiceSymbolName=KH-2.54FH-1X11P-H8.5
CN6: library part "D Connector 9", "DB9插座", PackageDocument=O, DatasheetDocument=1-Sep-1999, Gender=Receptacle, LatestRevisionDate=17-Jul-2002, LatestRevisionNote="Re-released for DXP Platform.", Orientation="Right Angle", PackageReference=788750, Positions=9, Published=15-Jun-2001, Publisher="Altium Limited"
D1: library part "D Schottky", "肖特基二极管", Code_JEDEC=DO-214-AA, LatestRevisionDate=17-Jul-2002, LatestRevisionNote="Re-released for DXP Platform.", Published=8-Jun-2000, Publisher="Altium Limited"
D2: library part TVS, "TVS二极管", LatestRevisionDate=17-Jul-2002, LatestRevisionNote="Re-released for DXP Platform.", Published=8-Jun-2000, Publisher="Altium Limited"
DS1 LD1 LD2 LD3 LD4: library part LED0, "发光二极管", LatestRevisionDate=08-Jul-2005, LatestRevisionNote="Mech Layer 1 removed.", PackageDescription="LED; 2 Leads", PackageReference=LED-0, Published=8-Jun-2000, Publisher="Altium Limited"
DS2: library part "Dpy Amber-4K", "4位0.36英寸红色共阴七段数码管", Pin=12, 焊接类型=直插
F1: library part "Fuse Thermal", "自恢复保险丝", LatestRevisionDate=17-Jul-2002, LatestRevisionNote="Re-released for DXP Platform.", PackageReference=PIN-W2/E2.8, Published=24-Mar-1999, Publisher="Altium Limited"
H1 H3 H5 H7: library part CMP-0003617-1, "安装孔"
H2 H4 H6 H8: library part CMP-0003610-1, "Standoff, Hex, 0.5\"L #4-40 Nylon"
JP1: library part Jumper2, "2.54双排插针", LatestRevisionDate=17-Jul-2002, LatestRevisionNote="Re-released for DXP Platform.", Published=24-Mar-1999, Publisher="Altium Limited"
K1 K2 K3 K4 K5: library part SW-PB, "鸿源精密轻触开关3X6", LatestRevisionDate=17-Jul-2002, LatestRevisionNote="Re-released for DXP Platform.", Published=24-Mar-1999, Publisher="Altium Limited"
L1 L4: library part FB1, "贴片电感", Code_IEC=1005, Code_JEITA=0402, LatestRevisionDate=29-May-2009, LatestRevisionNote="IPC-7351 Footprint Added.", PackageDescription="Chip Inductor", PackageReference=0402-A, Published=8-Jun-2000, Publisher="Altium Limited"
Logo1: library part CMP-0074836-1, "IEC 61010-1 Caution Warning"
M1 M2 M3: library part CMP-0077181-1, "MARK点"
Q1: library part 2SK3019, "N-MOSFET 60V300mA低开启电压", LatestRevisionDate=17-Jul-2002, LatestRevisionNote="Re-released for DXP Platform.", Published=8-Jun-2000, Publisher="Altium Limited"
R1 R2 R3 R4 R5 R6 R7 R8 R9 R11 R12 R13 R14 R15 R16 R17 R18 R19 R20 R21 R22 R23 R24 R25 R26 R27 R29 R30 R31 R32: library part Res, "贴片电阻", LatestRevisionDate=17-Jul-2002, LatestRevisionNote="Re-released for DXP Platform.", Published=8-Jun-2000, Publisher="Altium Limited"
R28: library part "RPot SM", "立式可调电位器", DatasheetDocument=Oct-2003, Published=17-Dec-2003, Publisher="Altium Limited"
R33: library part Res, "贴片电阻", Operating Temperature Range=-55~+125℃, Power Rating=1/10W, Temperature Coefficient="100ppm/ ℃", Tolerance=1%, Voltage Rating=75V, Category=贴片电阻, Composition="Thick Film", MountType="Surface Mount (SMD - SMT)", PackageReference=0603, RoHS=Y, Storage Room  Code=000000, Supplier 2=1
S1: library part SW-SPDT, "红色卧式弯脚小型扭子开关5脚2档", DatasheetDocument=05-Dec-2000, LatestRevisionDate=17-Dec-2003, LatestRevisionNote="Schematic revised, PCB Footprint replaced.", Published=24-Mar-1999, Publisher="Altium Limited"
SW1: library part SW-2B, "红色2PIN-2.54mm立式直插正拨拨码开关", LatestRevisionDate=17-Jul-2002, LatestRevisionNote="Re-released for DXP Platform.", Published=24-Mar-1999, Publisher="Altium Limited"
T1 T2 T3 T4 T5 T6: library part "GND SIDE", "静电GAP"
TP1 TP2 TP3 TP4 TP5 TP6: library part TP, "测试点"
TP20 TP21: library part CMP-0075110-1, "锰铜采样电阻 脚距10mm", Manufacturer=Harwin, Supplier Part Number 1=952-1873-ND, CNHeader=False, ComponentLink1Description="Datasheet URL", ComponentLink1URL=http://cdn.harwin.com/pdfs/D3080-D3083.pdf, CompType="Jumper Wire", CT=False, Green_EU RoHS="Passed with Exemption", Green_EU RoHS-2=Passed, Green_Lifecycle=Active, Green_REACh=Passed, LatestRevisionDate=2017-07-12, MountType=TH, PackageReference="Shorting Plug, 10.16mm spacing, TH", PartNumber=D3082-05, Publisher="Texas Instruments", RoHS=Y, Supplier 1=Digi-Key, Supplier 2=Newark, Supplier 3=Mouser, Supplier Part Number 2=01E9240, Supplier Part Number 3=855-D3082-05
U1: "进芯32位浮点DSP"
U2: library part ASM1117-3.3V, "线性稳压器"
U3: library part AT24C02C, "EEPROM存储器"
U4: library part W25Q128, "华邦FLASH存储器"
U5: library part BEEP, "超音V有源蜂鸣器 电磁式 脚距5,外径9.5mm"
U6: library part AIP650E, "无锡中微LED驱动芯片"
U7: library part SP3485E, "3.3V 485总线收发器"
U8: "3.3V CANͨѶ"
U9: library part MAX232, "低压232通讯芯片"
U10: library part AZ431AN-ATRE1, "2.5V基准芯片 0.5%, 1R,2C,3A", spiceSymbolName=https://item.szlcsc.com/192500.html
USB1: "Type-C 母座 卧贴", BOM_JLCPCB Part Class="Extended Part", BOM_Manufacturer=韩国韩荣, BOM_Manufacturer Part=TYPE-C-31-M-31, BOM_Supplier=LCSC, BOM_Supplier Part=C2760486, Contributor=LCSC, JLCPCB Part Class="Extended Part", spicePre=U, spiceSymbolName=TYPE-C-31-M-31
X1: library part XTAL, "5032贴片无源晶振", LatestRevisionDate=17-Jul-2002, LatestRevisionNote="Re-released for DXP Platform.", Published=8-Jun-2000, Publisher="Altium Limited"

## Free pads (board coordinates)
  round 1 hole 0.5: 4(112.8,31.853) 4(112.8,33.9)

## Via types
v1: diameter 0.6, hole 0.3, Top Layer to Bottom Layer, tented both sides, 170 vias
v2: diameter 0.8, hole 0.4, Top Layer to Bottom Layer, tented both sides, 64 vias
v3: diameter 1.27, hole 0.711, Top Layer to Bottom Layer, tented both sides, 4 vias

## Nets (pads, with @x,y where several pads share a name; then routed paths per layer and width w, separated by ;. In a path a pad name is that pad's centre, name@x,y a point inside that pad or via, vN(x,y) a via of type N, cw(c..) or ccw(c..) an arc to the next point about the centre after c; other vN are vias at no path point)
2.5VREF: C35.1 C36.1 JP1.4 JP1.6 R33.2 U10.1 U10.2 | length 20.5
  Top Layer w0.203: R33.2@71.851,20.767 72.084,21 73.6,21 U10.2@73.75,21.15 ; C35.1@71.851,25.767 72.018,25.6 73.484,25.6 C36.1@73.884,25.2 73.884,23.184 U10.1@73.75,23.05 U10.2@73.75,21.15 ; JP1.4@81.4,15 JP1.6@78.86,15 77.59,16.27 77.59,18.297 76.887,19 74.75,19 73.75,20 U10.2@73.75,21.15
485-A: CN4.3 R31.1 T3.1 U7.6 | length 12.3
  Top Layer w0.508: CN4.3@5.113,24.85 8.068,24.85 9.163,23.754 R31.1@11.122,23.754 11.979,22.897 U7.6@14.165,22.897
  Bottom Layer w0.254: CN4.3@5.113,24.85 5.126,24.862 T3.1@7.577,24.862
485-B: CN4.4 R31.2 T4.1 U7.7 | length 11.8
  Top Layer w0.508: CN4.4@5.113,19.85 5.444,20.181 8.593,20.181 9.266,20.854 R31.2@11.122,20.854 ; R31.2@11.547,20.854 12.32,21.627 U7.7@14.165,21.627
  Bottom Layer w0.254: CN4.4@5.113,19.85 5.163,19.8 T4.1@7.577,19.8
+5VDC: D1.1 F1.2 TP5.1 | length 8.9
  Top Layer w1: D1.1@23.6,64.5 D1.1@23.8,64.7
  Top Layer w1.2: TP5.1@19.4,68.9 19.449,68.85 F1.2@19.449,64.5 D1.1@23.6,64.5
A: DS2.a U6.8 | length 15.5
  Top Layer w0.254: v2(29.555,21.655) U6.8@29.555,23.1
  Bottom Layer w0.254: DS2.a@23.19,12.58 23.48,12.58 24.9,14 27.5,14 30.3,16.8 30.3,20.91 v2(29.555,21.655)
ADCINA0: CN2.28 JP1.3 U1.23 | length 48.3
  Top Layer w0.203: U1.23@67.994,32.193 67.994,18.689 77.303,9.381 79.624,9.381 80.749,8.255 81.886,8.255 84.02,6.121 CN2.28@84.02,6.04
  Bottom Layer w0.203: JP1.3@81.4,17.54 80.3,16.44 80.3,12.9 84.02,9.18 CN2.28@84.02,6.04
ADCINA1: CN2.27 U1.22 | length 37.6
  Top Layer w0.203: U1.22@67.494,32.193 67.494,18.615 77.134,8.974 79.455,8.974 80.581,7.849 81.717,7.849 82.683,6.883 82.683,4.837 CN2.27@84.02,3.5
ADCINA2: CN2.26 U1.21 | length 33.5
  Top Layer w0.203: U1.21@66.994,32.193 66.994,18.54 76.966,8.568 79.287,8.568 81.48,6.375 CN2.26@81.48,6.04
ADCINA3: CN2.25 U1.20 | length 36.1
  Top Layer w0.203: U1.20@66.494,32.193 66.494,18.465 76.798,8.161 78.839,8.161 80.193,6.807 80.193,4.787 CN2.25@81.48,3.5
ADCINA4: CN2.24 U1.19 | length 32.4
  Top Layer w0.203: U1.19@65.994,32.193 65.994,18.39 76.629,7.755 78.145,7.755 78.94,6.96 CN2.24@78.94,6.04 CN2.24@78.935,6.04
ADCINA5: CN2.23 U1.18 | length 34.5
  Top Layer w0.203: U1.18@65.494,32.193 65.494,18.316 76.461,7.349 76.951,7.349 77.577,6.723 77.577,4.863 CN2.23@78.94,3.5
ADCINA6: CN2.22 U1.17 | length 30.9
  Top Layer w0.203: U1.17@64.994,32.193 64.994,18.206 76.4,6.8 CN2.22@76.4,6.04
ADCINA7: CN2.21 U1.16 | length 40
  Top Layer w0.203: 64.487,25.171 64.487,18.138 75.164,7.461 75.164,4.736 CN2.21@76.4,3.5 ; 64.494,18.794 U1.16@64.494,32.193
ADCINB0: CN2.33 JP1.1 U1.28 | length 63.1
  Top Layer w0.203: U1.28@70.719,34.918 73.282,34.918 91.155,17.045 91.155,9.05 90.328,8.223 90.328,4.812 CN2.33@91.64,3.5
  Bottom Layer w0.203: JP1.1@83.94,17.54 82.7,16.3 82.7,11.5 85.1,9.1 85.1,5.6 86,4.7 90.44,4.7 CN2.33@91.64,3.5
ADCINB1: CN2.34 U1.29 | length 39.6
  Top Layer w0.203: U1.29@70.719,35.418 73.357,35.418 73.569,35.205 ; 73.587,35.187 91.562,17.213 91.562,6.118 CN2.34@91.64,6.04
ADCINB2: CN2.35 U1.30 | length 43.7
  Top Layer w0.203: U1.30@70.719,35.918 73.431,35.918 73.857,35.493 ; 73.875,35.475 91.968,17.381 91.968,9.171 92.792,8.347 92.792,4.888 CN2.35@94.18,3.5
ADCINB3: CN2.36 U1.31 | length 41.7
  Top Layer w0.203: U1.31@70.719,36.418 73.506,36.418 92.374,17.55 92.374,9.34 94.18,7.534 CN2.36@94.18,6.04
ADCINB4: CN2.37 U1.32 | length 45.9
  Top Layer w0.203: U1.32@70.719,36.918 73.581,36.918 92.781,17.718 92.781,9.919 95.459,7.241 95.459,4.761 CN2.37@96.72,3.5
ADCINB5: CN2.38 U1.33 | length 43.9
  Top Layer w0.203: U1.33@70.719,37.418 73.656,37.418 93.187,17.886 93.187,10.438 96.72,6.905 CN2.38@96.72,6.04
ADCINB6: CN2.39 U1.34 | length 48
  Top Layer w0.203: U1.34@70.719,37.918 73.73,37.918 93.594,18.055 93.594,11.006 97.999,6.601 97.999,4.761 CN2.39@99.26,3.5
ADCINB7: CN2.40 U1.35 | length 46
  Top Layer w0.203: U1.35@70.719,38.418 73.805,38.418 94,18.223 94,11.7 99.113,6.587 99.113,6.187 CN2.40@99.26,6.04
AGND: C15.1 C18.2 C23.1 C34.2 C35.2 C36.2 CN2.31 CN2.32 L4.2 R28.1 TP21.1 TP21.2 U1.26 U1.27 U10.3 | length 1.6
  Top Layer w0.203: U1.27@70.719,34.418 72.182,34.418 72.3,34.3
  other v1: 62.5,17.2 63.25,17.2 64,17.2 63.6,19.3 63.6,20.1 76.3,22.9 71.4,23.3 72.3,23.3 76.9,25.1 70.2,26.8
  other v2: 103.7,8.9 70.2,32.9 71.2,32.9
B: DS2.b U6.9 | length 7.5
  Top Layer w0.254: U6.9@29.555,17.9 29.555,15.345 30.5,14.4 31.53,14.4 DS2.b@33.35,12.58
C: DS2.c U6.11 | length 19.5
  Top Layer w0.254: DS2.c@28.27,2.42 28.27,2.67 35,9.4 35,12.9 32.095,15.805 U6.11@32.095,17.9
CAN_H: CN4.2 R30.2 T2.1 U8.7 | length 12.3
  Top Layer w0.508: CN4.2@5.113,29.85 7.603,29.85 8.682,30.929 R30.2@11.122,30.929 11.671,30.929 12.486,31.744 U8.7@14.165,31.744
  Bottom Layer w0.254: CN4.2@5.113,29.85 T2.1@7.577,29.85
CAN_L: CN4.1 R30.1 T1.1 U8.6 | length 12.3
  Top Layer w0.508: CN4.1@5.113,34.85 7.591,34.85 8.612,33.829 R30.1@11.122,33.829 11.632,33.829 12.447,33.014 U8.6@14.165,33.014
  Bottom Layer w0.254: CN4.1@5.113,34.85 T1.1@7.577,34.85
D: DS2.d U6.12 | length 26.2
  Top Layer w0.254: v2(32.946,5.7) 32.946,6.346 35.6,9 35.6,13.3 33.365,15.535 U6.12@33.365,17.9
  Bottom Layer w0.254: DS2.d@23.19,2.42 23.19,3.49 24.6,4.9 32.6,4.9 32.946,5.246 v2(32.946,5.7)
D1: DS2.com1 U6.1 | length 28.6
  Top Layer w0.254: v2(38.445,21.655) U6.1@38.445,23.1
  Bottom Layer w0.254: DS2.com1@20.65,12.58 22.687,10.543 34.089,10.543 37,13.453 37,20.21 v2(38.445,21.655)
D2: DS2.com2 U6.5 | length 13.6
  Top Layer w0.254: v2(33.365,21.635) U6.5@33.365,23.1
  Bottom Layer w0.254: DS2.com2@28.27,12.58 30.8,15.11 30.8,20.8 31.635,21.635 v2(33.365,21.635)
D3: DS2.com3 U6.6 | length 11.1
  Top Layer w0.254: U6.6@32.095,23.1 32.1,23.095 v2(32.1,20.6)
  Bottom Layer w0.254: DS2.com3@30.81,12.58 31.4,13.17 31.4,19.9 v2(32.1,20.6)
D4: DS2.com4 U6.7 | length 32.5
  Top Layer w0.254: U6.7@30.825,23.1 30.825,21.625 30.825,20.575 31.7,19.7 38.8,19.7 39.5,19 39.5,5.9 36.02,2.42 DS2.com4@33.35,2.42
D+: R12.1 USB1.A6 USB1.B6 | length 15
  Top Layer w0.203: USB1.B6@8.175,48.25 7.392,48.25 7.225,48.082 v1(6.299,48.082) 6.299,48.895 6.654,49.25 USB1.A6@8.175,49.25 ; v2(14.3,47.879) 15.046,47.133 R12.1@16.125,47.133
  Bottom Layer w0.203: v1(6.299,48.082) 14.097,48.082 v2(14.3,47.879)
D-: R11.1 USB1.A7 USB1.B7 | length 12.8
  Top Layer w0.203: v1(7.036,48.641) 7.145,48.75 USB1.A7@8.173,48.75 ; USB1.B7@8.173,49.75 v1(9.229,49.75) ; v2(14.3,48.9) 14.833,49.433 R11.1@16.125,49.433
  Bottom Layer w0.203: v1(7.036,48.641) 9.169,48.641 ; v1(9.229,49.75) 9.229,48.7 9.169,48.641 ; v2(14.3,48.9) 14.041,48.641 9.169,48.641
DGND: C1.2 C2.2 C3.1 C4.2 C5.2 C6.2 C7.2 C8.1 C9.1 C10.1 C11.1 C12.2 C13.1 C14.1 C15.2 C16.2 C17.2 C19.2 C20.2 C21.2 C22.2 C24.2 C25.2 C26.1 C29.1 C30.1 C31.1 C32.1 C33.1 C37.2 C38.2 CN1.2 CN2.3 CN2.4 CN3.4 CN3.8 CN3.10 CN3.12 CN5.1 CN6.5 D2.1 DS1.2 K1.2 K2.2 K3.2 K4.2 K5.2 L4.1 Q1.S R1.1 R3.1 R5.1 R25.2 R32.1 T1.2 T2.2 T3.2 T4.2 T5.2 T6.2 TP6.1 TP20.1 TP20.2 U1.4 U1.15 U1.36 U1.47 U1.62 U1.80 U1.90 U1.92 U2.1 U3.1 U3.2 U3.3 U3.4 U3.7 U4.4 U6.4 U7.5 U8.2 U9.15 USB1.0 USB1.A1B12 USB1.A12B1 | length 19.5
  Top Layer w0.203: U7.5@14.165,24.167 15.367,24.167 v1(15.4,24.2) ; v1(17.8,17.7) 17.822,17.722 C20.2@17.822,18.662 ; C12.2@52.7,38.6 53.5,38.6 54.182,37.918 U1.92@55.269,37.918 ; v1(53.7,44.1) 53.882,43.918 U1.80@55.269,43.918 ; v1(53.8,38.7) 54.018,38.918 U1.90@55.269,38.918 ; U1.4@58.494,32.193 58.494,30.606 v1(58.5,30.6) ; v1(62.8,30.6) 63.4,30.6 63.994,31.194 U1.15@63.994,32.193 ; U1.62@63.494,47.643 63.494,46.006 v1(63.9,45.6) ; U1.36@70.719,38.918 72.018,38.918 v1(72.5,39.4) ; U1.47@70.719,44.418 72.382,44.418 v1(72.7,44.1)
  Bottom Layer w0.203: C9.1@71.6,39.4 v1(72.5,39.4)
  other v1: 60.9,16.4 60.3,16.8 60.9,17.2 85.6,27.9 64.3,37 65.3,37.8 84.5,38.3 85.3,38.3 66.3,38.5 90.3,38.7 91,38.7 59.9,42 59.2,42.2 65.2,43 66.9,43 54.2,62.4 70.5,62.4 66.1,64.1 61.333,64.2 94.6,75.4
  other v2: 42.7,18.6 41,20.6 35.5,20.8 34.7,21.5 28.3,22.2 49,24.8 14.2,25.1 18.8,28.4 44.2,31.5 18,31.7 44.2,33.6 16.2,34.9 94,36.3 89.1,43.6 28.9,43.7 29.9,43.7 9.6,43.8 10.7,44.4 9.6,45 86.6,45.6 33.9,47.1 28.8,48.2 29.9,48.2 44.7,48.6 30,49.8 31,49.8 32,49.8 32.8,51 107,51.3 40.5,51.6 41.6,51.6 6.6,55.1 7.7,55.1 8.8,55.1 70,55.9 13.4,57.3 13.4,58.4 13.4,59.4 13.4,60.4 106.9,61.1 95.9,61.6 100.1,61.6 30.7,64.6 31.8,64.6 30.7,65.5 31.8,65.5
DP: DS2.dp U6.16 | length 25.8
  Top Layer w0.254: v2(36.3,4.8) 36.7,4.8 38.445,6.545 U6.16@38.445,17.9
  Bottom Layer w0.254: DS2.dp@25.73,2.42 27.753,4.443 35.743,4.443 36.1,4.8 v2(36.3,4.8)
DVDD3V3: C4.1 C5.1 C12.1 C16.1 C17.1 C19.1 C20.1 C21.1 C22.1 C26.2 C29.2 C30.2 C31.2 C32.2 C33.2 C37.1 C38.1 CN1.1 CN2.1 CN2.2 CN3.5 CN5.2 L1.2 R2.2 R4.2 R6.1 R7.1 R8.1 R13.1 R14.1 R15.2 R16.2 R17.2 R18.2 R19.2 R20.2 R21.1 R22.1 R24.1 R26.1 R29.1 TP4.1 U1.5 U1.13 U1.38 U1.46 U1.61 U1.79 U1.93 U2.2 U3.8 U4.3 U4.7 U4.8 U6.10 U7.8 U8.3 U9.16 | length 97.1
  Top Layer w0.203: v1(52.4,36.1) 52.7,36.4 C12.1@52.7,37 53.5,37 53.918,37.418 U1.93@55.269,37.418 ; U1.79@55.269,44.418 56.918,44.418 v1(57.197,44.697) ; v1(56.7,74.2) 56.75,74.15 R22.1@56.75,73.3 ; v1(58.852,34.9) 58.994,34.757 U1.5@58.994,32.193 ; R24.1@62.2,73.3 v1(62.2,74.3) ; v1(62.6,34) 62.994,33.606 U1.13@62.994,32.193 ; U1.61@63.994,47.643 63.994,46.406 64.75,45.65 65.714,45.65 v1(65.757,45.607) ; v1(69.2,40.3) 69.229,40.3 69.611,39.918 U1.38@70.719,39.918 ; v1(69.2,44) 69.282,43.918 U1.46@70.719,43.918 ; R29.1@73.1,73.3 v1(73.1,74.3)
  Top Layer w0.381: U7.8@14.165,20.357 15.585,20.357 16.222,19.72 C20.1@16.222,18.662 ; v2(14.9,18.7) 16.185,18.7 C20.1@16.222,18.662 ; C20.1@16.164,18.604 C20.1@16.222,18.662 ; v2(17.8,37.1) 17.8,33.9 18.686,33.014 U8.3@19.88,33.014 ; v1(27.5,18.7) C19.1@27.5,19.7 30.3,19.7 30.825,19.175 U6.10@30.825,17.9 ; U2.2@31.1,53.3 R13.1@35.5,53.3 ; v1(33.3,25.5) 33.324,25.476 R17.2@34.1,25.476 ; R16.2@39,25.476 39.876,25.476 v1(39.9,25.5) ; v1(45,24.8) 45.05,24.85 R6.1@46,24.85 ; L1.2@60.9,21.8 v1(60.9,22.9) ; R20.2@80.3,71.6 R19.2@83.3,71.6 R15.2@89.3,71.6 90.276,71.6 v1(90.308,71.568) ; U4.3@86.4,47.865 89.435,47.865 90.505,46.795 90.505,44.795 C17.1@90.7,44.6 v1(90.7,43.6) ; v1(90.7,51.6) R14.1@90.7,52.6 92.6,52.6 93.2,52 U4.8@93.2,50.405 ; U9.16@92.4,37.545 92.351,37.594 C22.1@92.351,39.6 93.218,39.6 v1(93.259,39.641) ; R2.2@113.997,61.137 113.997,62.097 v1(114,62.1) ; R4.2@114,51.3 v1(114,52.3)
  Top Layer w0.508: R21.1@26.6,37.55 28.05,37.55 v1(28.1,37.6) ; v1(44.3,52.6) C16.1@44.3,51.6 46.1,51.6 46.4,51.3 46.4,49.948 U3.8@46.357,49.905 ; R26.1@67.65,73.3 v1(68.6,73.3) ; v1(89.2,75.4) 89.25,75.35 R8.1@90.413,75.35 R7.1@92.007,75.35 ; U4.7@93.2,49.135 U4.8@93.2,50.405 ; v2(97.3,58.6) C37.1@97.3,59.733 101.926,59.733 CN5.2@102,59.66
  Bottom Layer w0.203: C32.2@56.3,44.7 56.303,44.697 v1(57.197,44.697) ; v1(58.852,34.9) 59.8,33.951 C30.2@59.8,33 ; C31.2@62.3,33 62.3,33.7 v1(62.6,34) ; v1(65.757,45.607) 66.081,45.283 C26.2@66.081,44.649 ; v1(69.2,40.3) C33.2@70,41.1 ; v1(69.2,44) 69.3,43.9 C29.2@70,43.9
  other v1: 81.8,71.6 87.8,71.6
  other v3: 23.3,48.9 25.3,48.9 27.4,48.9 27.4,51.1
E: DS2.e U6.13 | length 29.1
  Top Layer w0.254: U6.13@34.635,17.9 34.635,15.465 36.332,13.768 36.332,8.532 34.8,7 v2(34.8,6.3)
  Bottom Layer w0.254: DS2.e@20.65,2.42 20.65,2.95 23.094,5.394 31.594,5.394 32.554,6.354 34.746,6.354 v2(34.8,6.3)
EMU0: CN3.13 R7.2 | length 9.1
  Top Layer w0.203: CN3.13@88.332,84.576 89.6,83.308 89.6,80.6 92.007,78.193 R7.2@92.007,76.95
EMU1: CN3.14 R8.2 | length 5.9
  Top Layer w0.203: CN3.14@88.332,82.036 88.332,80.468 90.413,78.387 R8.2@90.413,76.95